# Altium PCB Membrane_Board.PcbDoc (part 4 of 5)
Units mm, origin at the board's own origin, x right, y up, seen from the top; angles counter-clockwise.
Board outline 303 x 126.06 mm, 2 copper layers (Top Layer, Bottom Layer), stack 1.499 mm thick; 248 components, 169 nets, 1258 pads, 728 vias.
Unrouted connection lines stored in the file: 317.
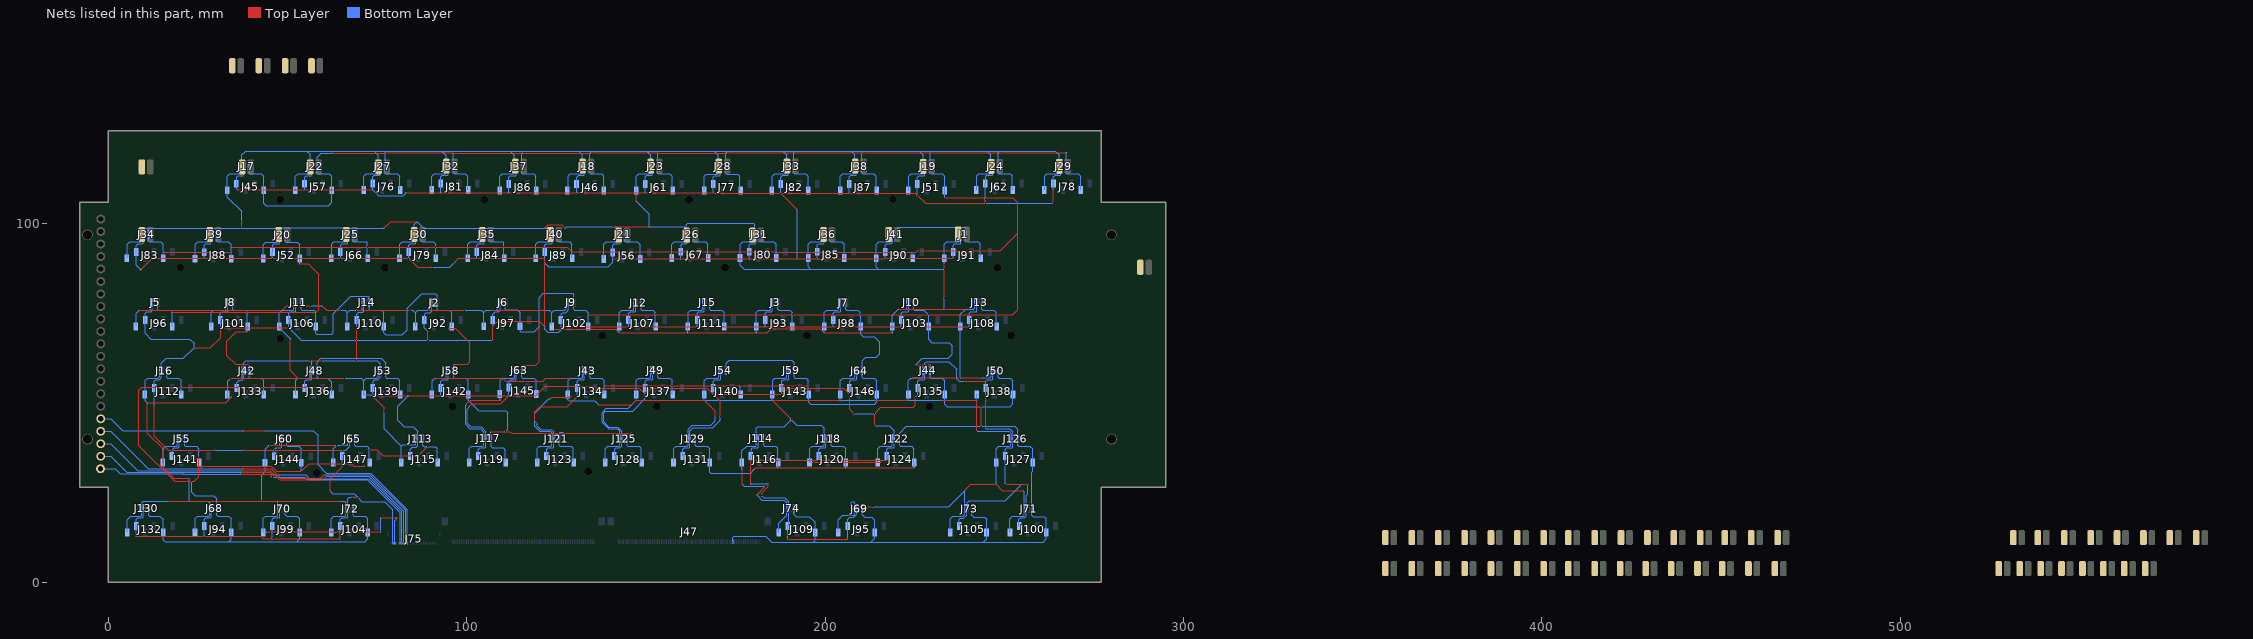
[diagram p4: the nets of this part, all layers, seen from the top]

## Via types
v1: diameter 0.4, hole 0.2, Top Layer to Bottom Layer, tented both sides, 724 vias
v2: diameter 0.4, hole 0.2, Top Layer to Bottom Layer, 3 vias
v3: diameter 0.6, hole 0.3, Top Layer to Bottom Layer, 1 vias

## Nets (pads, with @x,y where several pads share a name; then routed paths per layer and width w, separated by ;. In a path a pad name is that pad's centre, name@x,y a point inside that pad or via, vN(x,y) a via of type N, cw(c..) or ccw(c..) an arc to the next point about the centre after c; other vN are vias at no path point) (continued)
OLED_RST#: J1.5 J2.5 J3.5 J5.5 J6.5 J7.5 J8.5 J9.5 J10.5 J11.5 J12.5 J13.5 J14.5 J15.5 J16.5 J17.5 J18.5 J19.5 J20.5 J21.5 J22.5 J23.5 J24.5 J25.5 J26.5 J27.5 J28.5 J29.5 J30.5 J31.5 J32.5 J33.5 J34.5 J35.5 J36.5 J37.5 J38.5 J39.5 J40.5 J41.5 J42.5 J43.5 J44.5 J45.5 J46.5 J47.65 J48.5 J49.5 J50.5 J51.5 J52.5 J53.5 J54.5 J55.5 J56.5 J57.5 J58.5 J59.5 J60.5 J61.5 J62.5 J63.5 J64.5 J65.5 J66.5 J67.5 J68.5 J69.5 J70.5 J71.5 J72.5 J73.5 J74.5 J76.5 J77.5 J78.5 J79.5 J80.5 J81.5 J82.5 J83.5 J84.5 J85.5 J86.5 J87.5 J88.5 J89.5 J90.5 J91.5 J92.5 J93.5 J94.5 J95.5 J96.5 J97.5 J98.5 J99.5 J100.5 J101.5 J102.5 J103.5 J104.5 J105.5 J106.5 J107.5 J108.5 J109.5 J110.5 J111.5 J112.5 J113.5 J114.5 J115.5 J116.5 J117.5 J118.5 J119.5 J120.5 J121.5 J122.5 J123.5 J124.5 J125.5 J126.5 J127.5 J128.5 J129.5 J130.5 J131.5 J132.5 J133.5 J134.5 J135.5 J136.5 J137.5 J138.5 J139.5 J140.5 J141.5 J142.5 J143.5 J144.5 J145.5 J146.5 J147.5 | length 2367.4
  Top Layer w0.203: v1(15.252,92.087) v1(34.234,92.087) ; v1(17.825,75.364) v1(38.73,75.364) v1(57.846,75.364) 57.9,75.364 58.618,76.082 58.618,86.016 55.773,88.861 v1(53.411,88.861) ; v1(34.234,93.534) v1(53.411,93.534) 72.131,93.534 72.179,93.487 v1(72.232,93.487) ; v1(38.78,69.887) 35.631,69.887 33.04,67.296 33.04,63.207 35.453,60.794 v1(39.288,60.794) ; v1(62.44,119.783) 62.476,119.747 v1@77.273,119.747 ; v1@72.28,93.487 v1(91.308,93.487) ; v1(77.284,119.783) 77.337,119.783 77.435,119.882 95.926,119.882 96.012,119.795 96.203,119.795 v1@96.24,119.757 ; v1@91.308,93.534 v1(110.307,93.534) 127.96,93.534 v1(129.331,92.163) v1(148.381,92.163) v1(167.279,92.163) v1(186.304,92.163) ; v1(94.787,70.878) 96.769,70.878 100.858,66.788 100.858,61.556 100.172,60.87 v1(96.311,60.87) ; v1@96.261,119.783 v1(115.26,119.783) v1(134.266,119.783) 134.269,119.786 153.271,119.786 v1(153.274,119.79) ; v1(110.764,42.049) 111.977,42.049 112.46,41.566 v1(126.944,41.566) v1(145.994,41.566) ; v1(115.311,60.591) 119.222,60.591 120.137,61.505 v1(120.137,71.284) ; v1(138.323,54.876) v1(157.322,54.876) v1(176.321,54.876) v1(195.346,54.876) ; v1@153.274,119.783 172.181,119.783 v1(172.188,119.79) ; v1@172.191,119.786 191.253,119.786 v1(191.257,119.79) ; v1@186.351,92.141 v1(205.295,92.141) v1(224.31,92.141) 225.321,92.141 225.73,92.549 248.785,92.549 253.69,97.454 ; v1@191.26,119.786 191.263,119.79 v1(210.196,119.79) ; v1@210.199,119.786 210.202,119.79 v1(229.306,119.79) ; v1(225.267,60.667) v1@229.28,60.667 ; v1@229.309,119.786 229.313,119.79 v1(248.229,119.79) ; v1(233.344,107.276) 252.307,107.276 253.69,105.893 253.69,97.454 ; v1(247.772,74.688) 252.369,74.688 253.69,76.008 253.69,97.454 ; v1@248.229,119.783 248.245,119.799 267.219,119.799 v1(267.228,119.809)
  Top Layer w0.254: v1(25.242,35.038) 25.242,31.33 ; v1(62.275,54.391) v1(43.294,54.391) v1(20.264,54.391) 9.289,54.391 8.453,53.555 8.453,38.156 18.48,28.129 v1(23.21,28.129) 23.964,28.129 25.242,29.408 25.242,31.33 ; v1(71.546,32.346) 68.479,32.346 67.692,33.133 56.002,33.133 v1(53.817,30.949) 46.756,30.949 45.359,32.346 26.258,32.346 25.242,31.33 ; v1(72.799,36.994) 75.001,36.994 76.626,35.368 86.482,35.368 v1(88.996,37.883) ; v1(106.725,42.049) v1(110.764,42.049) ; v1(133.827,74.688) v1(152.623,74.688) v1(171.775,74.688) v1(190.825,74.688) v1(209.824,74.688) v1(228.823,74.688) v1(247.772,74.688) ; v1(180.081,31.381) 180.639,31.939 v1(186.812,31.939) v1@205.735,31.939 ; v1@205.773,31.939 v1@224.772,31.939 ; v1(243.53,43.496) v1(243.53,49.059)
  Bottom Layer w0.203: v1(23.21,28.129) 23.21,25.183 24.26,24.134 29.444,24.134 30.229,23.349 J68.5@30.229,20.593 ; v1(38.78,69.887) 38.78,71.384 J101.5@38.806,71.409 ; J17.5@39.256,115.886 J17.5@39.26,115.89 ; J42.5@39.28,59.074 39.28,60.786 v1(39.288,60.794) ; J45.5@43.336,109.407 43.336,105.768 43.987,105.117 61.412,105.117 62.325,106.03 J57.5@62.325,109.407 ; J106.5@57.846,71.409 57.846,69.515 58.161,69.201 62.275,69.201 62.733,69.658 62.733,74.916 67.584,79.768 72.588,79.768 72.758,79.598 J14.5@72.758,78.073 ; J22.5@58.248,116.072 58.248,118.624 59.382,119.757 62.414,119.757 v1(62.44,119.783) ; J27.5@77.282,116.099 77.282,119.782 v1(77.284,119.783) ; J32.5@96.257,116.126 v1@96.257,119.757 ; v1(96.311,60.87) 96.321,60.861 J58.5@96.321,59.074 ; v1@106.734,42.049 106.734,40.134 J117.5@106.743,40.126 ; J37.5@115.257,116.05 v1@115.257,119.783 ; J63.5@115.303,59.099 115.303,60.583 v1(115.311,60.591) ; J121.5@125.725,40.1 125.737,40.113 125.737,41.536 126.021,41.82 126.69,41.82 v1(126.944,41.566) ; J18.5@134.262,115.915 v1@134.262,119.783 ; J125.5@144.716,40.1 144.724,40.108 144.724,41.447 144.843,41.566 v1(145.994,41.566) ; J23.5@153.271,116.1 153.271,119.786 v1(153.274,119.79) ; J131.5@167.828,33.436 167.828,30.73 168.078,30.48 179.18,30.48 v1(180.081,31.381) ; J28.5@172.185,116.253 172.185,119.786 v1(172.188,119.79) ; J33.5@191.25,116.122 191.253,116.126 191.253,119.786 v1(191.257,119.79) ; J98.5@209.859,71.384 209.859,69.217 210.561,68.515 213.685,68.515 215.234,66.966 215.234,63.791 214.218,62.775 211.297,62.775 210.307,61.784 J64.5@210.307,59.074 ; J38.5@210.196,116.056 v1(210.196,119.79) ; J41.5@220.306,97.072 220.306,98.911 220.517,99.122 239.009,99.122 239.28,98.851 J1.5@239.28,97.072 ; v1(225.267,60.667) 227.121,62.521 234.386,62.521 235.453,63.588 235.453,66.001 234.614,66.839 229.788,66.839 228.841,67.787 J103.5@228.841,71.409 ; v1@229.297,60.65 229.297,59.116 J44.5@229.314,59.099 ; J19.5@229.306,116.056 v1(229.306,119.79) ; v1(248.229,119.79) 248.23,119.788 J24.5@248.23,116.148 ; v1(267.228,119.809) 267.237,119.799 J29.5@267.237,116.122
  Bottom Layer w0.254: J34.5@11.239,97.072 11.239,95.167 11.442,94.964 14.592,94.964 15.252,94.304 v1(15.252,92.087) J83.5@15.252,90.475 ; J130.5@11.256,20.593 11.256,18.688 11.459,18.485 14.338,18.485 15.269,17.554 J132.5@15.269,13.996 ; J5.5@13.744,78.073 13.744,76.168 13.947,75.965 17.677,75.965 17.825,75.816 v1(17.825,75.364) ; J132.5@15.336,13.929 15.336,11.924 15.895,11.365 71.597,11.365 72.35,12.118 J104.5@72.35,13.903 72.35,17.732 71.623,18.459 68.473,18.459 68.27,18.663 J72.5@68.27,20.568 ; J16.5@16.251,59.074 16.251,57.169 16.454,56.966 19.603,56.966 20.264,56.305 v1(20.264,54.391) J112.5@20.264,52.477 ; J96.5@17.824,71.409 v1@17.824,75.37 ; J55.5@21.246,40.049 21.246,38.144 21.45,37.941 24.599,37.941 25.26,37.281 J141.5@25.26,33.452 ; J68.5@30.229,20.593 30.229,18.688 30.432,18.485 33.581,18.485 34.242,17.824 J94.5@34.242,13.996 ; J39.5@30.229,97.098 30.229,95.193 30.432,94.99 33.49,94.99 34.234,94.246 ; 33.764,11.404 34.309,11.948 J94.5@34.309,13.929 ; J88.5@34.242,90.5 34.242,94.329 ; J8.5@34.726,78.073 34.726,76.168 34.929,75.965 38.57,75.965 38.73,75.805 v1(38.73,75.364) 38.73,71.485 J101.5@38.806,71.409 ; J17.5@39.256,115.886 39.256,114.167 39.46,113.963 42.609,113.963 43.27,113.303 J45.5@43.27,109.474 ; J42.5@39.28,59.074 39.28,57.169 39.484,56.966 42.633,56.966 43.294,56.305 v1(43.294,54.391) J133.5@43.294,52.477 ; J70.5@49.255,20.568 49.255,19.001 49.797,18.459 52.607,18.459 53.335,17.732 J99.5@53.335,13.903 53.335,12.102 52.623,11.391 ; J20.5@49.271,97.022 49.271,95.117 49.474,94.913 52.743,94.913 53.411,94.246 v1(53.411,88.861) ; J60.5@49.788,40.049 49.788,38.144 49.991,37.941 53.141,37.941 53.801,37.281 53.801,33.369 53.817,33.353 v1(53.817,30.949) ; J11.5@53.766,78.073 53.766,76.168 53.97,75.965 57.395,75.965 v1@57.819,75.542 ; J106.5@57.846,71.409 v1@57.846,75.191 ; J22.5@58.245,116.072 58.245,114.167 58.448,113.963 61.598,113.963 62.258,113.303 J57.5@62.258,109.474 ; J136.5@62.275,52.477 v1(62.275,54.391) 62.275,55.815 61.158,56.933 58.498,56.933 58.262,57.169 J48.5@58.262,59.074 58.262,61.48 59.227,62.445 76.169,62.445 77.322,61.292 J53.5@77.322,59.049 77.322,57.144 77.525,56.94 80.674,56.94 81.335,56.28 J139.5@81.335,52.451 ; J25.5@68.27,97.072 68.27,95.167 68.473,94.964 72.072,94.964 72.232,94.804 72.232,90.526 J66.5@72.35,90.408 ; J65.5@68.786,40.075 68.786,38.17 68.989,37.967 72.139,37.967 72.799,37.306 v1(72.799,36.994) J147.5@72.799,33.477 ; J14.5@72.758,78.073 72.758,76.168 72.961,75.965 76.11,75.965 76.771,75.305 J110.5@76.771,71.476 ; J110.5@76.838,71.409 76.838,69.574 77.312,69.1 82.011,69.1 83.383,70.471 83.383,76.491 87.421,80.53 91.206,80.53 91.706,80.03 J2.5@91.706,78.048 91.706,76.143 91.909,75.94 95.059,75.94 95.719,75.279 J92.5@95.719,71.45 ; J27.5@77.28,116.097 77.28,114.192 77.483,113.989 80.633,113.989 81.293,113.328 J76.5@81.293,109.5 ; J30.5@87.286,97.072 87.286,95.167 87.49,94.964 90.684,94.964 91.308,94.341 v1(91.308,93.487) ; J113.5@87.744,40.1 87.744,38.195 88.056,37.883 v1(88.996,37.883) 91.205,37.883 91.757,37.332 J115.5@91.757,33.503 ; J79.5@91.3,90.475 91.308,90.483 v1@91.308,93.479 ; J32.5@96.254,116.122 96.254,114.217 96.457,114.014 99.607,114.014 100.267,113.354 J81.5@100.267,109.525 ; J58.5@96.321,59.074 96.321,57.169 96.524,56.966 99.674,56.966 100.334,56.305 100.334,50.777 103.271,47.84 110.797,47.84 111.35,47.287 111.424,47.212 111.424,42.709 v1(110.764,42.049) ; J35.5@106.311,97.072 106.311,95.167 106.514,94.964 110.02,94.964 110.307,94.677 110.307,94.246 ; J117.5@106.743,40.126 106.743,37.789 107.03,37.502 110.104,37.502 110.756,36.85 J119.5@110.756,33.528 ; J84.5@110.324,90.475 110.324,94.304 ; J6.5@110.756,78.099 110.756,76.194 110.959,75.99 114.109,75.99 114.836,75.263 J97.5@114.836,71.434 114.836,70.069 114.985,69.92 118.772,69.92 v1(120.137,71.284) 120.137,79.437 121.33,80.631 129.509,80.631 129.773,80.368 J9.5@129.773,78.073 129.773,76.168 129.976,75.965 133.125,75.965 133.822,75.269 133.822,74.693 v1(133.827,74.688) J102.5@133.827,71.517 ; J37.5@115.253,116.046 115.253,114.141 115.456,113.938 118.606,113.938 119.266,113.278 J86.5@119.266,109.449 ; J63.5@115.303,59.099 115.303,57.194 115.506,56.991 118.655,56.991 119.316,56.331 J145.5@119.316,52.502 ; J40.5@125.294,97.072 125.294,95.167 125.497,94.964 128.647,94.964 129.331,94.28 v1(129.331,92.163) J89.5@129.331,90.499 ; J121.5@125.725,40.1 125.725,38.195 125.928,37.992 129.077,37.992 129.738,37.332 J123.5@129.738,33.503 ; J18.5@134.251,116.122 134.251,114.217 134.454,114.014 137.604,114.014 138.264,113.354 J46.5@138.264,109.525 ; J43.5@134.284,59.074 134.284,57.169 134.488,56.966 137.637,56.966 138.323,56.28 v1(138.323,54.876) J134.5@138.323,52.502 ; J21.5@144.241,97.072 144.241,95.167 144.444,94.964 147.594,94.964 148.381,94.177 v1(148.381,92.163) J56.5@148.381,90.232 ; J125.5@144.716,40.1 144.716,38.195 144.919,37.992 148.069,37.992 148.729,37.332 J128.5@148.729,33.503 ; J12.5@148.619,77.997 148.619,76.092 148.823,75.889 151.972,75.889 152.633,75.228 J107.5@152.633,71.4 ; J23.5@153.268,116.097 153.268,114.192 153.471,113.989 156.62,113.989 157.281,113.328 J61.5@157.281,109.5 ; J49.5@153.318,59.099 153.318,57.194 153.522,56.991 156.671,56.991 157.332,56.331 J137.5@157.332,52.502 ; J26.5@163.258,97.098 163.258,95.193 163.461,94.99 166.611,94.99 167.271,94.329 J67.5@167.271,90.5 ; J129.5@163.748,40.1 163.748,38.195 163.952,37.992 167.101,37.992 167.828,37.265 J131.5@167.828,33.436 ; J15.5@167.779,78.073 167.779,76.168 167.982,75.965 171.132,75.965 171.792,75.305 J111.5@171.792,71.476 ; J28.5@172.2,116.021 172.2,114.116 172.403,113.913 175.553,113.913 176.213,113.252 J77.5@176.213,109.423 ; J54.5@172.316,59.099 172.316,61.081 173.172,61.937 190.698,61.937 191.315,61.319 J59.5@191.315,59.099 191.315,57.194 191.519,56.991 194.668,56.991 195.329,56.331 J143.5@195.329,52.502 ; J47.65@174.26,11.315 174.26,12.53 174.62,12.889 183.459,12.889 185.135,11.213 196.692,11.213 ; J140.5@176.329,52.502 v1@176.329,54.876 ; J31.5@182.3,97.098 182.3,95.193 182.503,94.99 185.653,94.99 186.313,94.329 J80.5@186.313,90.5 ; J114.5@182.79,40.126 182.79,38.221 182.994,38.017 186.143,38.017 186.812,37.349 186.812,33.52 J116.5@186.87,33.461 186.812,33.403 v1(186.812,31.939) ; J3.5@186.78,78.073 186.78,76.168 186.983,75.965 190.132,75.965 190.793,75.305 J93.5@190.793,71.476 ; J33.5@191.25,116.122 191.25,114.217 191.453,114.014 194.603,114.014 195.263,113.354 J82.5@195.263,109.525 ; J74.5@191.258,20.593 191.258,18.959 191.892,18.325 195.575,18.325 197.218,16.682 J109.5@197.218,13.929 197.218,11.738 196.692,11.213 ; J143.5@195.395,52.435 195.395,50.254 195.956,49.694 213.761,49.694 214.387,50.32 J146.5@214.387,52.41 214.387,56.239 213.659,56.966 210.51,56.966 210.307,57.169 J64.5@210.307,59.074 ; J36.5@201.282,97.098 201.282,95.193 201.485,94.99 204.634,94.99 205.295,94.329 v1(205.295,92.141) J85.5@205.295,90.5 ; J118.5@201.697,40.1 201.697,38.195 201.901,37.992 205.05,37.992 205.711,37.332 J120.5@205.711,33.503 ; v1(205.76,31.939) J120.5@205.76,33.419 ; J7.5@205.779,78.048 205.779,76.143 205.982,75.94 209.132,75.94 209.792,75.279 v1@209.792,74.688 ; v1(209.824,74.688) 209.824,74.648 209.859,74.613 J98.5@209.859,71.384 ; J38.5@210.205,116.122 210.205,114.217 210.408,114.014 213.558,114.014 214.218,113.354 J87.5@214.218,109.525 ; J69.5@210.307,20.568 210.307,18.884 211.018,18.173 212.974,18.173 213.853,17.293 J95.5@213.853,13.929 213.853,12.296 212.77,11.213 ; J90.5@224.319,90.475 v1@224.319,92.141 ; J124.5@224.743,33.477 224.743,37.306 224.083,37.967 220.933,37.967 220.73,38.17 J122.5@220.73,40.075 220.73,41.575 222.651,43.496 v1(243.53,43.496) 252.953,43.496 253.774,42.676 J126.5@253.774,40.075 253.774,38.17 253.977,37.967 257.127,37.967 257.854,37.239 J127.5@257.854,33.411 257.854,30.922 257.597,30.665 257.597,24.323 257.595,24.321 J71.5@257.595,20.568 ; J10.5@224.761,78.073 224.761,76.168 224.964,75.965 227.546,75.965 v1(228.823,74.688) ; v1(224.785,31.939) 224.785,33.385 J124.5@224.81,33.411 ; J103.5@228.837,71.413 v1@228.837,74.62 ; J44.5@229.314,59.099 229.314,57.194 229.517,56.991 232.667,56.991 233.394,56.264 J135.5@233.394,52.435 233.394,49.721 234.081,49.034 251.658,49.034 252.394,49.77 J138.5@252.394,52.41 252.394,56.239 251.667,56.966 248.518,56.966 248.314,57.169 J50.5@248.314,59.074 ; J19.5@229.315,116.046 229.315,114.141 229.518,113.938 232.668,113.938 233.328,113.278 J51.5@233.328,109.449 ; v1(233.344,107.276) J51.5@233.344,109.366 ; J1.5@239.28,97.072 239.28,95.167 239.483,94.964 242.633,94.964 243.293,94.304 J91.5@243.293,90.475 ; J73.5@240.923,20.568 240.923,18.663 241.413,18.173 244.563,18.173 245.003,17.732 J105.5@245.003,13.929 245.003,12.153 244.063,11.213 ; J13.5@243.742,78.073 243.742,76.168 243.946,75.965 247.095,75.965 247.756,75.305 J108.5@247.756,71.476 ; J24.5@248.23,116.122 248.23,114.243 248.433,114.04 251.583,114.04 252.243,113.379 J62.5@252.243,109.55 ; J71.5@257.585,20.577 257.585,18.672 257.983,18.274 261.133,18.274 261.665,17.742 J100.5@261.665,13.991 ; J100.5@261.716,13.929 261.716,12.102 260.827,11.213 244.063,11.213 ; J29.5@267.237,116.122 267.237,114.217 267.441,114.014 270.59,114.014 271.251,113.354 J78.5@271.251,109.525 ; 196.692,11.213 212.77,11.213 ; 212.77,11.213 244.063,11.213
  other v1: 229.306,60.667 243.276,92.549 96.261,119.757
Row.ROW_1: J75.17 P17.1 SW1.1 SW2.1 SW3.1 SW4.1 SW5.1 SW6.1 SW7.1 SW8.1 SW41.1 SW42.1 SW43.1 SW44.1 SW45.1 SW46.1 SW47.1 SW48.1 | length 110.2
  Top Layer w0.203: v1(37.536,42.252) v1(43.327,42.252)
  Bottom Layer w0.203: P17.1@-2.153,45.62 0.641,45.62 4.009,42.252 v1(37.536,42.252) ; v1(43.327,42.252) 57.189,42.252 58.465,40.976 58.465,32.828 60.802,30.492 73.156,30.492 83.389,20.258 J75.17@83.389,10.908
Row.ROW_2: J75.18 P18.1 SW9.1 SW10.1 SW11.1 SW12.1 SW13.1 SW14.1 SW15.1 SW16.1 SW49.1 SW50.1 SW51.1 SW52.1 SW53.1 SW54.1 SW55.1 SW56.1 | length 104.2
  Top Layer w0.203: v1(37.434,31.66) 45.353,31.66 48.031,28.981 59.106,28.981 v1(60.141,30.016)
  Bottom Layer w0.203: P18.1@-2.153,42.136 0.641,42.136 11.117,31.66 v1(37.434,31.66) v1@37.442,31.66 ; v1(60.141,30.016) 72.924,30.016 82.889,20.051 J75.18@82.889,10.908
Row.ROW_3: J75.19 P19.1 SW17.1 SW18.1 SW19.1 SW20.1 SW21.1 SW22.1 SW23.1 SW24.1 SW57.1 SW58.1 SW59.1 SW60.1 SW61.1 SW62.1 SW63.1 SW64.1 | length 102
  Top Layer w0.203: v1(37.002,31.177) 45.21,31.177 47.787,28.6 59.789,28.6 v1(60.726,29.537)
  Bottom Layer w0.203: P19.1@-2.153,38.653 0.641,38.653 8.116,31.177 v1(37.002,31.177) ; v1(60.726,29.537) 72.696,29.537 82.389,19.844 J75.19@82.389,10.908
Row.ROW_4: J75.20 P20.1 SW25.1 SW26.1 SW27.1 SW28.1 SW29.1 SW30.1 SW31.1 SW32.1 SW65.1 SW66.1 SW67.1 SW68.1 SW69.1 SW70.1 SW71.1 SW72.1 | length 99.2
  Top Layer w0.203: v1(37.587,30.695) 45.015,30.695 v1(45.741,29.968)
  Bottom Layer w0.203: P20.1@-2.153,35.169 0.641,35.169 5.115,30.695 v1(37.587,30.695) ; v1(45.741,29.968) 45.763,29.947 55.042,29.947 56.032,28.956 72.57,28.956 81.889,19.637 J75.20@81.889,10.908
Row.ROW_5: J75.21 P21.1 SW33.1 SW34.1 SW35.1 SW36.1 SW37.1 SW38.1 SW39.1 SW40.1 SW73.1 SW74.1 SW75.1 SW76.1 SW77.1 SW78.1 SW79.1 SW80.1 | length 97.2
  Top Layer w0.203: v1(37.079,30.212) 44.819,30.212 v1(45.72,29.312)
  Bottom Layer w0.203: P21.1@-2.217,31.685 1.868,31.685 3.334,30.22 20.859,30.22 20.866,30.212 v1(37.079,30.212) ; v1(45.72,29.312) 54.712,29.312 55.474,28.55 72.233,28.55 81.389,19.393 J75.21@81.389,10.908
VCC_3V3: J1.2 J2.2 J3.2 J5.2 J6.2 J7.2 J8.2 J9.2 J10.2 J11.2 J12.2 J13.2 J14.2 J15.2 J16.2 J17.2 J18.2 J19.2 J20.2 J21.2 J22.2 J23.2 J24.2 J25.2 J26.2 J27.2 J28.2 J29.2 J30.2 J31.2 J32.2 J33.2 J34.2 J35.2 J36.2 J37.2 J38.2 J39.2 J40.2 J41.2 J42.2 J43.2 J44.2 J45.2 J46.2 J48.2 J49.2 J50.2 J51.2 J52.2 J53.2 J54.2 J55.2 J56.2 J57.2 J58.2 J59.2 J60.2 J61.2 J62.2 J63.2 J64.2 J65.2 J66.2 J67.2 J68.2 J69.2 J70.2 J71.2 J72.2 J73.2 J74.2 J75.25 J76.2 J77.2 J78.2 J79.2 J80.2 J81.2 J82.2 J83.2 J84.2 J85.2 J86.2 J87.2 J88.2 J89.2 J90.2 J91.2 J92.2 J93.2 J94.2 J95.2 J96.2 J97.2 J98.2 J99.2 J100.2 J101.2 J102.2 J103.2 J104.2 J105.2 J106.2 J107.2 J108.2 J109.2 J110.2 J111.2 J112.2 J113.2 J114.2 J115.2 J116.2 J117.2 J118.2 J119.2 J120.2 J121.2 J122.2 J123.2 J124.2 J125.2 J126.2 J127.2 J128.2 J129.2 J130.2 J131.2 J132.2 J133.2 J134.2 J135.2 J136.2 J137.2 J138.2 J139.2 J140.2 J141.2 J142.2 J143.2 J144.2 J145.2 J146.2 J147.2 | length 2042.9
  Top Layer w0.254: v1(7.716,12.864) 7.739,12.841 26.666,12.841 v1(26.689,12.818) ; v1(9.037,87.159) 12.247,90.369 v1(26.691,90.369) v1(45.767,90.369) v1(64.773,90.369) v1(83.772,90.369) 86.27,87.87 v1(90.266,87.87) ; v1(12.711,49.5) 12.711,40.782 16.651,36.842 v1(17.775,36.842) v1(29.721,36.842) ; v1(23.896,65.445) 28.446,65.445 31.287,68.287 v1(31.287,71.03) v1(50.296,71.03) ; v1@26.689,12.864 42.565,12.864 43.251,12.178 v1(45.715,12.178) v1(64.73,12.178) ; v1(35.758,109.486) v1(54.706,109.486) v1(73.782,109.486) ; v1(37.815,36.842) v1(65.271,36.842) ; v1(56.383,61.835) v1(59.914,61.835) ; v1(61.869,25.386) 61.869,28.869 v1(65.222,32.222) ; v1@68.321,23.684 v1(69.565,23.684) ; v1(69.218,61.835) v1(69.218,67.499) v1(69.218,71.259) ; v1(75.052,52.033) v1(83.586,52.033) v1(92.781,52.033) v1(111.755,52.033) ; v1@83.14,108.661 v1(92.773,108.661) v1(111.752,108.661) v1(130.616,108.661) ; v1(89.098,67.499) v1(89.098,70.065) ; v1(96.565,89.267) 97.667,90.369 v1(102.814,90.369) v1(121.788,90.369) v1(121.788,71.284) 120.213,72.859 108.564,72.859 v1(107.217,71.513) v1@107.217,67.498 ; v1(100.858,49.059) 101.569,49.77 109.492,49.77 v1(111.755,52.033) ; v1(119.583,44.272) 118.897,44.958 118.897,47.549 120.306,48.957 127.96,48.957 v1(130.744,51.742) ; v1(126.283,71.284) v1(145.114,71.284) v1(164.291,71.284) v1(183.29,71.284) v1(202.229,71.284) v1(221.263,71.284) v1(240.202,71.284) ; 130.819,108.661 v1(149.785,108.661) v1(168.751,108.661) ; v1(140.763,90.315) v1(159.719,90.315) v1@178.75,90.315 ; v1@168.751,108.534 v1@187.59,108.534 ; v1(170.733,46.316) 170.733,50.481 v1(168.803,52.412) ; v1(178.761,90.315) v1(192.222,90.315) v1(197.743,90.315) v1@216.742,90.315 ; v1(179.242,27.418) 179.25,27.426 v1(179.25,33.99) ; v1@179.258,33.998 v1@198.191,33.998 ; v1(182.29,24.192) 182.29,24.908 184.125,26.742 v1(184.125,27.457) ; v1(189.598,12.004) v1(206.309,12.004) ; v1@192.222,103.902 v1(187.59,108.534) ; v1@198.208,34.006 v1(217.231,34.006) ; v1(207.97,47.052) 206.808,48.214 v1(206.808,52.455) 205.106,54.156 189.517,54.156 v1(187.825,52.464) 187.799,52.438 168.829,52.438 v1(168.803,52.412) ; v1@213.786,46.9 213.786,43.7 v1@213.812,43.674 ; v1(213.786,47.052) 215.514,48.78 224.505,48.78 225.191,49.465 v1(225.191,51.574) ; v1(216.768,90.36) v1(235.707,90.359) ; v1(239.041,56.102) v1(244.816,56.102) ; v1(244.69,105.701) 227.999,105.701 v1(225.724,107.976) 225.166,108.534 v1(206.759,108.534) v1(187.59,108.534) ; v1@244.69,105.768 v1(244.69,106.796) ; v1(244.774,42.785) v1(244.774,50.812) ; v1(250.235,27.329) v1(256.458,27.329) ; v1(263.697,105.701) v1(263.697,109.689) ; v1(111.755,52.033) 119.199,52.033 121.915,54.749 v1(129.535,54.749) 135.605,54.749 136.24,54.114 148.127,54.114 v1(149.82,52.421) 151.512,54.114 167.101,54.114 v1(168.803,52.412)
  Bottom Layer w0.203: J125.2@143.216,40.1 143.216,42.185 142.108,43.293 139.644,43.293 138.151,44.787 138.151,47.213 138.65,47.713 146.248,47.713 149.82,51.285 v1(149.82,52.421)
  Bottom Layer w0.254: v1(7.716,12.864) J132.2@7.716,15.729 ; J132.2@7.758,15.77 7.758,17.621 8.164,18.028 9.607,18.028 9.756,18.176 J130.2@9.756,20.593 ; v1(9.037,87.159) 7.699,88.497 J83.2@7.699,92.208 7.699,93.949 8.257,94.507 9.59,94.507 9.739,94.656 J34.2@9.739,97.072 ; J96.2@10.204,73.209 10.204,69.482 11.831,67.855 22.728,67.855 23.9,66.683 v1@23.9,65.441 ; J96.2@10.245,73.25 10.245,75.101 10.652,75.508 11.889,75.508 12.244,75.863 J5.2@12.244,78.073 ; v1(12.711,49.5) J112.2@12.711,54.21 ; J112.2@12.752,54.251 12.752,56.102 13.158,56.509 14.175,56.509 14.751,57.084 J16.2@14.751,59.074 14.751,61.072 16.149,62.47 20.921,62.47 v1(23.896,65.445) ; J141.2@17.748,35.227 17.748,36.842 18.39,37.484 19.408,37.484 19.746,37.823 J55.2@19.746,40.049 ; v1(26.689,12.818) J94.2@26.689,15.729 ; v1@26.69,90.37 J88.2@26.69,92.091 26.69,94.086 27.136,94.532 28.58,94.532 28.729,94.681 J39.2@28.729,97.098 ; J94.2@26.73,15.77 26.73,17.621 27.136,18.028 28.58,18.028 28.729,18.176 J68.2@28.729,20.593 ; v1(29.721,36.842) v1(37.815,36.842) ; J101.2@31.211,73.087 31.287,73.011 v1(31.287,71.03) ; J101.2@31.227,73.25 31.227,75.101 31.634,75.508 33.077,75.508 33.226,75.657 J8.2@33.226,78.073 ; v1(35.758,109.486) 35.758,113.1 36.164,113.506 37.608,113.506 37.756,113.655 J17.2@37.756,116.072 ; J133.2@35.782,54.251 35.782,55.738 36.469,56.425 37.307,56.425 37.78,56.898 J42.2@37.78,59.074 37.78,61.267 38.349,61.835 v1(56.383,61.835) 56.762,61.456 J48.2@56.762,59.074 56.762,56.657 56.606,56.501 55.163,56.501 54.764,56.102 J136.2@54.764,54.251 ; v1(45.715,12.178) J99.2@45.715,15.703 ; J99.2@45.756,15.745 45.756,17.596 46.162,18.002 47.606,18.002 47.755,18.151 J70.2@47.755,20.568 ; v1(45.767,90.369) J52.2@45.767,92.165 ; J52.2@45.772,92.199 45.772,94.05 46.178,94.456 47.622,94.456 47.771,94.605 J20.2@47.771,97.022 ; J144.2@46.289,35.227 46.289,36.918 46.856,37.484 48.139,37.484 48.288,37.633 J60.2@48.288,40.049 ; J106.2@50.268,73.25 50.268,75.101 50.674,75.508 52.118,75.508 52.266,75.657 J11.2@52.266,78.073 ; v1@50.295,71.03 J106.2@50.295,72.7 ; v1(50.296,71.03) 53.827,67.499 v1(69.218,67.499) v1(89.098,67.499) v1(107.208,67.499) ; v1(54.706,109.486) 54.705,109.487 J57.2@54.705,111.207 54.705,113.058 55.153,113.506 56.596,113.506 56.745,113.655 J22.2@56.745,116.072 ; v1(59.914,61.835) 75.001,61.835 75.822,61.014 J53.2@75.822,59.049 75.822,57.22 75.084,56.483 74.229,56.483 73.823,56.077 J139.2@73.823,54.226 ; v1(61.869,25.386) 62.529,24.726 68.524,24.726 v1(69.565,23.684) 70.734,22.516 77.108,22.516 79.389,20.235 J75.25@79.389,10.908 ; v1(64.73,12.178) J104.2@64.73,15.703 64.73,17.554 65.178,18.002 66.621,18.002 66.77,18.151 J72.2@66.77,20.568 66.77,23.327 67.127,23.684 v1(68.27,23.684) ; v1(64.773,90.369) 64.771,94.101 65.178,94.507 66.621,94.507 66.77,94.656 J25.2@66.77,97.072 ; v1(65.222,32.222) 65.246,32.246 J147.2@65.246,35.211 65.271,35.236 v1(65.271,36.842) 66.212,36.842 67.286,37.915 J65.2@67.286,40.075 ; v1(69.218,71.259) J110.2@69.218,73.209 69.218,74.772 69.845,75.399 71,75.399 71.258,75.657 J14.2@71.258,78.073 ; v1@73.74,109.527 75.453,107.814 82.261,107.814 v1(83.108,108.661) ; J76.2@73.74,111.311 73.782,111.27 v1(73.782,109.486) ; J139.2@73.773,54.176 J139.2@73.782,54.184 73.782,52.793 74.542,52.033 v1(75.052,52.033) ; J76.2@73.782,111.274 73.782,113.125 74.188,113.532 75.631,113.532 75.78,113.68 J27.2@75.78,116.097 ; v1(83.586,52.033) 80.716,49.163 80.716,45.224 82.57,43.369 85.008,43.369 86.244,42.134 J113.2@86.244,40.1 86.244,38.128 85.821,37.705 84.78,37.705 84.245,37.17 J115.2@84.245,35.277 ; v1(83.772,90.369) J79.2@83.772,92.312 ; J79.2@83.788,92.25 83.788,94.101 84.194,94.507 85.638,94.507 85.786,94.656 J30.2@85.786,97.072 ; J92.2@88.166,73.184 88.166,70.997 v1(89.098,70.065) ; J92.2@88.207,73.225 88.207,74.839 88.615,75.246 89.809,75.246 90.206,75.643 J2.2@90.206,78.048 ; v1(90.266,87.87) 95.168,87.87 v1(96.565,89.267) ; J81.2@92.729,111.311 92.773,111.267 v1(92.773,108.661) ; J81.2@92.755,111.3 92.755,113.151 93.162,113.557 94.605,113.557 94.754,113.706 J32.2@94.754,116.122 ; v1(92.781,52.033) J142.2@92.781,54.21 92.781,56.061 93.229,56.509 94.672,56.509 94.821,56.657 J58.2@94.821,59.074 ; v1(100.858,49.059) 100.101,48.302 100.101,44.329 101.087,43.344 103.957,43.344 105.243,42.058 J117.2@105.243,40.126 105.243,37.709 105.094,37.56 103.651,37.56 103.244,37.154 J119.2@103.244,35.303 ; v1@102.812,90.369 102.812,94.101 103.219,94.507 104.662,94.507 104.811,94.656 J35.2@104.811,97.072 ; v1@107.216,71.462 J97.2@107.216,73.182 ; J97.2@107.257,73.276 107.257,74.762 107.945,75.45 108.808,75.45 109.256,75.897 J6.2@109.256,78.099 ; J86.2@111.729,111.166 111.729,113.049 112.161,113.481 113.604,113.481 113.753,113.63 J37.2@113.753,116.046 ; v1(111.752,108.661) J86.2@111.752,111.166 ; v1(111.755,52.033) J145.2@111.755,54.364 111.755,56.078 112.21,56.534 113.654,56.534 113.803,56.683 J63.2@113.803,59.099 ; v1(119.583,44.272) 119.583,43.593 120.594,42.582 123.616,42.582 124.225,41.974 J121.2@124.225,40.1 124.225,37.684 124.076,37.535 122.632,37.535 122.226,37.128 J123.2@122.226,35.277 ; v1(121.788,71.284) 121.788,70.649 122.6,69.836 125.623,69.836 126.283,70.497 v1(126.283,71.284) ; J89.2@121.788,92.312 v1(121.788,90.369) 121.788,89.089 122.88,87.997 139.466,87.997 140.763,89.294 v1(140.763,90.315) ; J89.2@121.796,92.25 121.796,94.101 122.202,94.507 123.645,94.507 123.794,94.656 J40.2@123.794,97.072 ; v1@126.274,71.275 126.274,74.78 126.741,75.246 127.63,75.246 128.273,75.889 J9.2@128.273,78.073 ; v1(129.535,54.749) 130.76,54.749 130.786,54.774 130.786,56.102 131.192,56.509 132.636,56.509 132.784,56.657 J43.2@132.784,59.074 ; J46.2@130.601,111.166 130.601,113 131.159,113.557 132.602,113.557 132.751,113.706 J18.2@132.751,116.122 ; v1(130.616,108.661) J46.2@130.616,111.151 ; v1(130.744,51.742) J134.2@130.744,54.21 ; J56.2@140.743,92.25 140.743,94.101 141.149,94.507 142.592,94.507 142.741,94.656 J21.2@142.741,97.072 ; v1@140.761,90.316 J56.2@140.761,92.032 ; J128.2@141.217,35.277 141.217,37.128 141.624,37.535 142.725,37.535 143.216,38.026 J125.2@143.216,40.1 ; J107.2@145.079,73.133 145.114,73.098 v1(145.114,71.284) ; J107.2@145.121,73.174 145.121,75.025 145.527,75.432 146.971,75.432 147.119,75.58 J12.2@147.119,77.997 ; J61.2@149.769,111.274 149.769,113.125 150.175,113.532 151.619,113.532 151.768,113.68 J23.2@151.768,116.097 ; v1(149.785,108.661) J61.2@149.785,111.166 ; v1(149.82,52.421) 149.82,56.128 150.226,56.534 151.67,56.534 151.818,56.683 J49.2@151.818,59.099 ; v1@159.718,90.315 J67.2@159.718,92.238 ; J67.2@159.759,92.275 159.759,94.126 160.166,94.532 161.258,94.532 161.758,95.032 J26.2@161.758,97.098 ; J131.2@160.25,35.277 160.25,37.128 160.656,37.535 162.1,37.535 162.248,37.684 J129.2@162.248,40.1 162.248,42.225 163.139,43.115 168.574,43.115 170.733,45.274 v1(170.733,46.316) ; J111.2@164.239,73.209 164.291,73.157 v1(164.291,71.284) ; J111.2@164.28,73.25 164.28,75.101 164.687,75.508 166.13,75.508 166.279,75.657 J15.2@166.279,78.073 ; v1(168.751,108.661) J77.2@168.751,111.166 ; J77.2@168.752,111.166 168.752,113.1 169.108,113.455 170.551,113.455 170.7,113.604 J28.2@170.7,116.021 ; J140.2@168.776,54.235 168.803,54.208 v1(168.803,52.412) ; J140.2@168.818,54.277 168.818,56.128 169.224,56.534 170.667,56.534 170.816,56.683 J54.2@170.816,59.099 ; v1@178.76,90.315 J80.2@178.76,92.238 ; J80.2@178.801,92.275 178.801,94.126 179.208,94.532 180.651,94.532 180.8,94.681 J31.2@180.8,97.098 ; v1(179.242,27.418) 179.262,27.438 184.105,27.438 v1(184.125,27.457) ; v1(179.25,33.99) J116.2@179.25,35.179 ; J116.2@179.292,35.303 179.292,37.154 179.698,37.56 181.142,37.56 181.29,37.709 J114.2@181.29,40.126 ; v1(182.29,24.192) 182.925,23.557 188.691,23.557 189.758,22.491 J74.2@189.758,20.593 189.758,15.889 J109.2@189.598,15.729 v1(189.598,12.004) ; J93.2@183.281,73.25 183.281,75.101 183.687,75.508 185.131,75.508 185.28,75.657 J3.2@185.28,78.073 ; v1@183.289,71.233 J93.2@183.289,72.954 ; v1(187.59,108.534) J82.2@187.59,111.166 ; J82.2@187.599,111.166 187.599,112.998 188.158,113.557 189.601,113.557 189.75,113.706 J33.2@189.75,116.122 ; 187.817,56.128 188.223,56.534 189.667,56.534 189.815,56.683 J59.2@189.815,59.099 ; v1(187.825,52.464) 187.825,56.17 ; v1(192.222,90.315) v1(192.222,103.898) ; v1@197.742,90.315 J85.2@197.742,92.308 ; J85.2@197.783,92.275 197.783,94.126 198.189,94.532 199.633,94.532 199.782,94.681 J36.2@199.782,97.098 ; J120.2@198.157,35.236 198.199,35.195 v1(198.199,34.006) ; J120.2@198.199,35.277 198.199,37.128 198.605,37.535 200.049,37.535 200.197,37.684 J118.2@200.197,40.1 ; v1(202.229,71.284) J98.2@202.229,72.845 ; J98.2@202.28,73.225 202.28,75.076 202.687,75.482 204.13,75.482 204.279,75.631 J7.2@204.279,78.048 ; v1(206.309,12.004) 206.309,15.653 J95.2@206.233,15.729 206.233,17.604 206.801,18.173 207.995,18.173 208.807,18.984 J69.2@208.807,20.568 ; J87.2@206.706,111.3 206.706,113.151 207.113,113.557 208.556,113.557 208.705,113.706 J38.2@208.705,116.122 ; v1(206.759,108.534) J87.2@206.759,111.166 ; v1(206.808,52.455) 206.808,56.102 207.214,56.509 208.658,56.509 208.807,56.657 J64.2@208.807,59.074 ; v1(207.97,47.052) v1(213.786,47.052) ; v1@213.812,43.674 217.901,43.674 219.23,42.345 J122.2@219.23,40.075 219.23,37.658 219.081,37.509 217.638,37.509 217.231,37.103 v1(217.231,34.006) ; v1@216.766,90.36 J90.2@216.766,92.283 ; J90.2@216.808,92.25 216.808,94.101 217.214,94.507 218.434,94.507 218.806,94.88 J41.2@218.806,97.072 ; v1@221.262,71.285 J103.2@221.262,73.208 ; J103.2@221.262,73.25 221.262,75.101 221.668,75.508 223.112,75.508 223.261,75.657 J10.2@223.261,78.073 ; v1(225.191,51.574) 225.774,52.156 J135.2@225.774,54.235 225.826,54.287 225.826,56.138 226.222,56.534 227.665,56.534 227.814,56.683 J44.2@227.814,59.099 227.814,61.054 228.341,61.581 234.538,61.581 236.697,59.422 236.697,56.831 237.426,56.102 v1(239.041,56.102) ; v1(225.724,107.976) J51.2@225.724,111.166 225.724,112.982 226.223,113.481 227.666,113.481 227.815,113.63 J19.2@227.815,116.046 ; v1(235.707,90.359) 235.707,92.175 J91.2@235.74,92.208 235.74,94.059 236.188,94.507 237.631,94.507 237.78,94.656 J1.2@237.78,97.072 ; J105.2@237.383,15.782 237.383,17.554 237.671,17.842 238.526,17.842 239.423,18.739 J73.2@239.423,20.568 239.423,22.067 240.126,22.77 250.286,22.77 254.845,27.329 v1(256.458,27.329) 256.458,24.609 256.095,24.246 J71.2@256.095,20.568 ; v1(240.202,71.284) J108.2@240.202,73.099 ; J108.2@240.244,73.25 240.244,75.101 240.65,75.508 242.094,75.508 242.242,75.657 J13.2@242.242,78.073 ; v1(244.69,105.701) v1(263.697,105.701) ; v1(244.69,106.796) J62.2@244.69,111.284 ; J62.2@244.732,111.325 244.732,113.176 245.138,113.582 246.581,113.582 246.73,113.731 J24.2@246.73,116.148 ; v1(244.774,42.785) 251.556,42.785 252.274,42.067 J126.2@252.274,40.075 252.274,37.658 252.125,37.509 250.682,37.509 250.275,37.103 J127.2@250.275,35.252 ; v1(244.774,50.812) J138.2@244.774,54.21 ; J138.2@244.816,54.251 v1(244.816,56.102) 245.222,56.509 246.666,56.509 246.814,56.657 J50.2@246.814,59.074 ; v1@250.234,27.329 J127.2@250.234,35.211 ; J100.2@254.045,15.791 254.045,17.564 254.493,18.012 255.561,18.012 256.085,18.536 J71.2@256.085,20.568 ; v1(263.697,109.689) J78.2@263.697,111.258 263.697,113.109 264.145,113.557 265.589,113.557 265.737,113.706 J29.2@265.737,116.122
  other v1: 46.299,36.842 213.786,43.674
VDD: J1.1 J2.1 J3.1 J5.1 J6.1 J7.1 J8.1 J9.1 J10.1 J11.1 J12.1 J13.1 J14.1 J15.1 J16.1 J17.1 J18.1 J19.1 J20.1 J21.1 J22.1 J23.1 J24.1 J25.1 J26.1 J27.1 J28.1 J29.1 J30.1 J31.1 J32.1 J33.1 J34.1 J35.1 J36.1 J37.1 J38.1 J39.1 J40.1 J41.1 J42.1 J43.1 J44.1 J45.1 J46.1 J48.1 J49.1 J50.1 J51.1 J52.1 J53.1 J54.1 J55.1 J56.1 J57.1 J58.1 J59.1 J60.1 J61.1 J62.1 J63.1 J64.1 J65.1 J66.1 J67.1 J68.1 J69.1 J70.1 J71.1 J72.1 J73.1 J74.1 J75.24 J76.1 J77.1 J78.1 J79.1 J80.1 J81.1 J82.1 J83.1 J84.1 J85.1 J86.1 J87.1 J88.1 J89.1 J90.1 J91.1 J92.1 J93.1 J94.1 J95.1 J96.1 J97.1 J98.1 J99.1 J100.1 J101.1 J102.1 J103.1 J104.1 J105.1 J106.1 J107.1 J108.1 J109.1 J110.1 J111.1 J112.1 J113.1 J114.1 J115.1 J116.1 J117.1 J118.1 J119.1 J120.1 J121.1 J122.1 J123.1 J124.1 J125.1 J126.1 J127.1 J128.1 J129.1 J130.1 J131.1 J132.1 J133.1 J134.1 J135.1 J136.1 J137.1 J138.1 J139.1 J140.1 J141.1 J142.1 J143.1 J144.1 J145.1 J146.1 J147.1 | length 2288.7
  Top Layer w0.203: v1(76.879,98.843) 78.696,100.66 v1(86.106,100.66) ; v1(121.858,98.85) 122.78,99.771 126.524,99.771 v1(127.452,98.843) ; v1@140.877,99.275 v1(150.837,99.275)
  Top Layer w0.254: v1(8.638,75.965) v1(29.373,75.965) v1(48.45,75.965) 49.712,77.228 v1(56.433,77.228) ; v1(16.682,22.643) v1(47.255,22.643) v1(64.663,22.643) ; v1(22.524,28.968) 18.276,28.968 15.235,32.009 v1(15.235,37.197) 10.786,41.645 v1(10.786,50.15) 32.681,50.15 v1(34.231,51.7) ; v1(34.056,56.933) v1(52.877,56.933) ; v1(37.155,98.818) v1(37.155,100.621) ; v1(44.337,14.15) v1(63.286,14.15) 76.001,14.15 v1(76.017,14.134) ; v1(44.884,38.17) v1(63.636,38.17) ; v1(50.693,67.914) 50.693,59.117 v1(52.877,56.933) ; v1(59.558,77.228) 60.904,75.881 v1(64.753,75.881) ; v1(65.904,56.933) v1(52.877,56.933) ; v1@69.032,75.983 69.133,75.881 v1(84.196,75.881) ; v1(74.32,51.34) 76.957,48.703 v1(76.957,47.652) ; v1(76.017,17.944) v1(80.614,17.944) ; v1(89.149,75.881) v1(99.359,75.881) ; v1(91.028,56.984) v1(109.951,56.984) 110.815,56.12 121.127,56.12 121.973,56.966 v1(128.932,56.966) ; v1(100.172,49.897) 101.137,50.862 v1(109.291,50.862) ; v1(107.056,75.881) v1(120.924,75.881) ; v1(123.337,51.193) 123.718,51.574 v1(129.281,51.574) ; v1(124.683,70.624) 141.49,70.624 v1(142.531,69.582) v1(161.691,69.582) v1(180.725,69.582) 183.865,69.582 185.008,70.725 198.597,70.725 v1(199.74,69.582) v1(218.681,69.582) ; v1(136.85,49.542) 146.011,49.542 v1(147.281,50.812) v1(166.236,50.812) 169.286,47.762 v1(169.286,46.316) ; v1(147.254,106.345) v1(147.254,107.938) ; v1(176.779,27.418) v1(176.779,31.609) ; v1(180.97,24.269) 180.998,24.297 180.998,24.426 183.315,26.744 v1(183.315,26.749) ; v1(190.571,45.427) 190.543,45.455 190.543,45.555 v1(185.286,50.812) v1(204.244,50.812) ; v1(196.692,33.463) v1(215.691,33.463) ; v2(207.062,21.119) v2(213.253,21.119) ; v1(213.749,50.812) v1(223.234,50.812) ; v1(220.34,76.237) v1(239.161,76.237) ; v1(224.073,57.111) v1(237.662,57.111) v1(243.107,57.111) ; v1@232.182,50.812 v1(242.234,50.812) v1(242.234,42.125) ; v1@233.267,79.085 v1(233.267,87.337) v1(233.267,88.833) ; v1(238.958,25.615) 240.672,27.329 v1(247.694,27.329) 249.434,25.589 v1(255.595,25.589)
  Bottom Layer w0.203: J34.1@9.239,97.072 9.239,98.689 9.403,98.854 28.229,98.854 ; J39.1@28.229,97.098 28.229,98.854 ; J17.1@37.256,116.072 37.256,119.265 38.261,120.269 55.353,120.269 ; 46.991,98.854 28.229,98.854 ; J20.1@47.271,97.022 47.271,98.574 46.97,98.875 66.02,98.875 66.27,98.625 ; J22.1@56.245,116.072 56.245,119.377 55.353,120.269 ; J25.1@66.27,97.072 66.27,98.625 ; J27.1@75.28,116.097 75.28,119.213 74.225,120.269 ; v1(76.879,98.843) 66.488,98.843 66.27,98.625 ; J30.1@85.286,97.072 85.286,99.841 v1(86.106,100.66) 87.916,98.85 104.086,98.85 ; J32.1@94.254,116.122 94.254,119.003 92.988,120.269 ; J35.1@104.311,97.072 104.311,98.625 104.086,98.85 ; 112.169,120.247 113.253,119.163 J37.1@113.253,116.046 ; J40.1@123.294,97.072 123.294,98.625 123.069,98.85 v1(121.858,98.85) 104.086,98.85 ; v1(127.452,98.843) 127.865,99.256 141.61,99.256 142.241,98.625 J21.1@142.241,97.072 ; J18.1@132.251,116.122 132.251,119.239 131.221,120.269 ; J125.1@142.716,39.89 J125.1@142.716,40.1 142.716,42.126 142.057,42.785 139.613,42.785 137.77,44.629 137.77,47.371 138.924,48.526 144.995,48.526 v1(147.281,50.812) 147.281,52.392 J137.1@147.238,52.435 ; v1(147.254,106.345) 150.837,102.763 v1(150.837,99.275) 160.634,99.275 161.258,98.651 ; 150.239,120.242 151.268,119.213 J23.1@151.268,116.097 ; J26.1@161.258,97.098 161.258,98.651 ; J28.1@170.2,116.021 170.2,119.137 169.068,120.269 ; J31.1@180.3,97.098 180.3,99.868 179.928,100.24 161.691,100.24 161.258,99.807 161.258,98.651 ; J33.1@189.25,116.115 189.25,119.231 188.214,120.267 188.214,120.269 ; J38.1@208.205,116.115 208.205,119.231 207.639,119.798 207.634,119.798 207.162,120.269 ; J19.1@227.315,116.046 227.315,119.163 226.209,120.269 ; J24.1@246.23,116.115 246.23,119.231 245.193,120.269 ; J71.1@255.595,20.568 v1(255.595,25.589) ; J29.1@265.237,116.122 265.237,119.239 264.207,120.269 245.193,120.269 ; 55.353,120.269 74.225,120.269 ; 74.225,120.269 92.988,120.269 ; 92.988,120.269 131.221,120.269 ; 131.221,120.269 169.068,120.269 ; 169.068,120.269 188.214,120.269 ; 188.214,120.269 207.162,120.269 ; 207.162,120.269 226.209,120.269 ; 226.209,120.269 245.193,120.269
  Bottom Layer w0.254: J83.1@5.226,90.475 5.226,94.304 5.886,94.964 9.036,94.964 9.239,95.167 J34.1@9.239,97.072 ; J132.1@5.243,13.996 5.243,17.477 6.25,18.485 9.053,18.485 9.256,18.688 J130.1@9.256,20.593 9.278,20.615 9.278,22.224 9.697,22.643 v1(16.682,22.643) ; J96.1@7.731,71.476 7.731,75.058 v1(8.638,75.965) 11.541,75.965 11.744,76.168 J5.1@11.744,78.073 ; v1@10.79,50.151 10.237,50.703 10.237,56.305 10.898,56.966 13.718,56.966 14.251,57.498 J16.1@14.251,59.074 ; J141.1@15.233,33.452 v1@15.233,37.281 ; v1(15.235,37.197) 15.979,37.941 19.043,37.941 19.246,38.144 J55.1@19.246,40.049 ; v1(22.524,22.643) 27.757,22.643 28.229,22.171 J68.1@28.229,20.593 28.229,18.688 28.025,18.485 24.876,18.485 24.215,17.824 J94.1@24.215,13.996 ; v1@22.524,22.719 v1(22.524,28.968) ; J88.1@24.215,90.5 24.215,94.329 24.876,94.99 28.025,94.99 28.229,95.193 J39.1@28.229,97.098 ; J101.1@28.713,71.476 28.713,75.305 v1(29.373,75.965) 32.523,75.965 32.726,76.168 J8.1@32.726,78.073 ; J133.1@33.2,52.41 33.2,51.945 J133.1@33.708,51.437 ; J133.1@33.267,52.477 33.267,56.144 v1(34.056,56.933) 37.044,56.933 37.28,57.169 J42.1@37.28,59.074 ; v1(37.155,100.621) 37.155,103.466 33.176,107.444 J45.1@33.176,109.407 33.176,113.236 33.904,113.963 37.053,113.963 37.256,114.167 J17.1@37.256,116.072 ; v1(42.768,22.643) 42.768,29.882 43.683,30.796 J144.1@43.683,33.369 ; J99.1@43.175,13.903 J99.1@43.241,13.97 ; J52.1@43.257,90.424 43.257,94.253 43.918,94.913 47.067,94.913 47.271,95.117 J20.1@47.271,97.022 ; J99.1@43.354,14.083 J99.1@43.241,13.97 ; J99.1@43.552,14.154 v1@44.464,14.154 ; J144.1@43.775,33.452 43.775,37.061 v1(44.884,38.17) ; v1@44.858,38.17 47.541,38.17 47.788,38.416 J60.1@47.788,40.049 ; v1(47.255,22.643) 47.255,18.663 47.051,18.459 43.902,18.459 43.241,17.799 J99.1@43.241,13.97 ; v1(50.693,67.914) 48.194,70.412 48.194,70.901 J106.1@47.686,71.409 47.686,75.202 v1(48.45,75.965) 51.563,75.965 51.766,76.168 J11.1@51.766,78.073 ; J57.1@52.165,109.407 52.165,113.236 52.892,113.963 56.042,113.963 56.245,114.167 J22.1@56.245,116.072 ; J136.1@52.249,52.477 52.249,56.305 v1(52.877,56.933) 56.026,56.933 56.262,57.169 J48.1@56.262,59.074 ; v1(56.433,77.228) v1(59.558,77.228) ; J66.1@62.257,90.475 62.257,94.304 62.917,94.964 66.067,94.964 66.27,95.167 J25.1@66.27,97.072 ; J147.1@62.706,33.411 62.706,33.032 J147.1@63.214,32.524 ; J147.1@62.773,33.477 62.773,37.306 v1(63.636,38.17) 66.637,38.17 66.786,38.319 J65.1@66.786,40.075 ; v1@63.387,14.15 v1(63.286,14.15) 62.436,14.15 J104.1@62.19,13.903 62.19,17.732 62.917,18.459 66.067,18.459 66.27,18.663 J72.1@66.27,20.568 66.27,22.306 65.933,22.643 v1(64.663,22.643) ; v1(64.753,75.881) 66.035,75.881 66.678,75.238 J110.1@66.678,71.409 ; v1(65.904,56.933) 70.589,56.933 71.242,56.28 ; 66.744,75.305 67.321,75.881 70.471,75.881 70.758,76.168 J14.1@70.758,78.073 ; J76.1@71.267,109.5 71.267,113.328 71.927,113.989 75.077,113.989 75.28,114.192 J27.1@75.28,116.097 ; v1(74.32,51.34) 73.276,52.384 J139.1@71.242,52.384 71.242,56.28 ; J53.1@75.322,59.049 75.322,57.457 74.805,56.94 71.902,56.94 71.242,56.28 ; v1(76.017,14.134) v1(76.017,17.944) ; v1(76.957,47.652) 76.957,42.785 81.73,38.011 ; J75.24@79.889,10.908 79.889,17.219 v1(80.614,17.944) ; J79.1@81.273,90.475 81.273,94.304 81.934,94.964 85.083,94.964 85.286,95.167 J30.1@85.286,97.072 ; J115.1@81.73,33.503 81.73,38.011 ; v1(84.196,75.881) 84.855,75.881 85.693,75.043 ; J92.1@85.693,71.45 85.693,75.043 ; J113.1@85.744,40.1 85.744,38.542 85.593,38.391 82.11,38.391 81.73,38.011 ; 86.346,75.881 v1(89.149,75.881) 89.706,76.439 J2.1@89.706,78.048 ; 86.346,75.932 85.693,75.279 85.693,75.043 ; J81.1@90.241,109.525 90.241,113.354 90.901,114.014 94.051,114.014 94.254,114.217 J32.1@94.254,116.122 ; J142.1@90.308,52.477 90.308,56.263 v1(91.028,56.984) 94.136,56.984 94.321,57.169 J58.1@94.321,59.074 ; v1(99.359,75.881) 104.084,75.881 104.743,75.222 ; v1(100.172,49.897) 99.67,49.395 99.67,44.044 100.877,42.836 103.83,42.836 104.743,41.923 J117.1@104.743,40.126 104.743,38.221 104.54,38.017 101.39,38.017 100.73,37.357 J119.1@100.73,33.528 ; J84.1@100.298,90.475 100.298,94.304 100.958,94.964 104.108,94.964 104.311,95.167 J35.1@104.311,97.072 ; J97.1@104.743,71.501 104.743,75.222 ; J6.1@108.756,78.099 108.756,76.413 108.224,75.881 105.294,75.881 104.743,75.33 104.743,75.222 ; J86.1@109.24,109.449 109.24,113.278 109.9,113.938 113.05,113.938 113.253,114.141 J37.1@113.253,116.046 ; v1(109.291,50.862) 109.289,50.864 109.289,56.331 109.95,56.991 113.099,56.991 113.303,57.194 J63.1@113.303,59.099 ; J89.1@119.281,90.475 119.281,94.304 119.941,94.964 123.091,94.964 123.294,95.167 J40.1@123.294,97.072 ; J123.1@119.711,33.503 119.711,37.332 120.372,37.992 123.521,37.992 123.725,38.195 J121.1@123.725,40.1 123.725,41.661 123.312,42.074 120.34,42.074 118.897,43.516 118.897,47.16 122.906,51.169 123.313,51.169 v1(123.337,51.193) ; v1(120.924,75.881) 123.049,75.881 123.693,75.238 ; J102.1@123.693,71.919 123.693,75.238 ; J9.1@127.773,78.073 127.773,76.389 127.265,75.881 124.336,75.881 123.693,75.238 ; J134.1@128.204,52.41 J134.1@128.204,52.082 ; J46.1@128.238,109.525 128.238,113.354 128.898,114.014 132.048,114.014 132.251,114.217 J18.1@132.251,116.122 ; J134.1@128.271,52.477 128.271,56.305 v1(128.932,56.966) 132.081,56.966 132.284,57.169 J43.1@132.284,59.074 ; v1(129.281,51.574) 128.712,51.574 J134.1@128.204,52.082 ; v1(136.85,49.542) 135.758,50.634 128.519,50.634 128.204,50.948 J134.1@128.204,52.082 ; J56.1@138.228,90.475 138.228,94.304 138.888,94.964 142.038,94.964 142.241,95.167 J21.1@142.241,97.072 ; J128.1@138.636,33.436 138.636,37.265 139.363,37.992 142.513,37.992 142.716,38.195 J125.1@142.716,39.89 ; v1(142.531,69.582) J107.1@142.531,71.325 ; J107.1@142.539,71.333 142.539,75.162 143.267,75.889 146.416,75.889 146.619,76.092 J12.1@146.619,77.997 ; v1(147.254,107.938) 147.254,113.328 147.915,113.989 151.064,113.989 151.268,114.192 J23.1@151.268,116.097 ; J137.1@147.305,52.502 147.305,56.331 147.966,56.991 151.115,56.991 151.318,57.194 J49.1@151.318,59.099 ; J67.1@157.245,90.5 157.245,94.329 157.905,94.99 161.055,94.99 161.258,95.193 J26.1@161.258,97.098 ; J131.1@157.735,33.503 157.735,37.332 158.396,37.992 161.545,37.992 161.748,38.195 161.748,42.639 162.936,43.827 168.092,43.827 169.286,45.02 v1(169.286,46.316) ; v1@161.691,69.608 J111.1@161.691,71.169 ; J111.1@161.766,71.476 161.766,75.305 162.426,75.965 165.576,75.965 165.779,76.168 J15.1@165.779,78.073 ; J77.1@166.187,109.423 166.187,113.252 166.847,113.913 169.997,113.913 170.2,114.116 J28.1@170.2,116.021 ; J54.1@170.316,59.099 170.316,57.194 170.113,56.991 166.963,56.991 166.236,56.264 J140.1@166.236,52.435 v1(166.236,50.812) v1(185.286,50.812) 185.286,52.384 J143.1@185.235,52.435 ; J80.1@176.22,90.434 176.245,90.408 176.245,88.505 177.414,87.337 195.879,87.337 ; J80.1@176.287,90.5 176.287,94.329 176.947,94.99 180.097,94.99 180.3,95.193 J31.1@180.3,97.098 ; v1(176.779,27.418) 177.45,26.746 183.313,26.746 v1(183.315,26.749) ; v1(176.779,31.609) 176.777,31.611 176.777,36.637 178.158,38.017 180.587,38.017 180.79,38.221 J114.1@180.79,40.126 180.79,42.981 181.154,43.344 188.564,43.344 190.571,45.351 192.044,43.877 198.826,43.877 199.697,43.006 J118.1@199.697,40.1 199.697,38.195 199.494,37.992 196.345,37.992 195.684,37.332 J120.1@195.684,33.503 ; v1@180.724,69.608 J93.1@180.724,71.531 ; J93.1@180.766,71.476 180.766,75.305 181.427,75.965 184.576,75.965 184.78,76.168 J3.1@184.78,78.073 ; v1(180.97,24.269) 182.29,22.948 188.503,22.948 189.258,22.193 J74.1@189.258,20.593 189.258,18.689 187.058,16.488 J109.1@187.058,13.929 ; J82.1@185.237,109.525 185.237,113.354 185.897,114.014 189.047,114.014 189.25,114.217 J33.1@189.25,116.122 ; J143.1@185.302,52.502 185.302,56.331 185.963,56.991 189.112,56.991 189.315,57.194 J59.1@189.315,59.099 ; J85.1@195.202,90.434 195.202,88.015 195.879,87.337 ; J85.1@195.268,90.5 195.268,94.329 195.929,94.99 199.078,94.99 199.282,95.193 J36.1@199.282,97.098 ; J120.1@195.617,33.436 v1@196.625,33.436 ; v1(199.74,69.582) J98.1@199.74,71.589 ; J98.1@199.766,71.45 199.766,75.279 200.426,75.94 203.576,75.94 203.779,76.143 J7.1@203.779,78.048 ; J95.1@203.693,13.929 203.693,17.503 204.896,18.706 207.918,18.706 208.259,19.047 208.259,20.52 J69.1@208.307,20.568 208.307,22.103 207.963,22.447 207.515,22.447 207.062,21.993 v2(207.062,21.119) ; J87.1@204.192,109.525 204.192,113.354 204.852,114.014 208.002,114.014 208.205,114.217 J38.1@208.205,116.122 ; J146.1@204.227,52.41 204.227,56.239 204.954,56.966 208.103,56.966 208.307,57.169 J64.1@208.307,59.074 ; v1@204.243,50.714 J146.1@204.243,52.41 ; v1@204.244,50.71 204.284,50.71 204.385,50.812 v1(213.749,50.812) ; v2(213.253,21.119) 234.462,21.119 v1@238.94,25.597 ; J124.1@214.717,33.477 214.717,37.306 215.377,37.967 218.527,37.967 218.73,38.17 J122.1@218.73,40.075 ; J124.1@214.817,33.463 v1(215.691,33.463) ; J41.1@218.306,97.072 218.306,95.167 218.103,94.964 214.953,94.964 214.293,94.304 214.293,87.872 214.828,87.337 ; v1@218.681,69.586 J103.1@218.681,71.409 218.681,74.578 v1(220.34,76.237) 222.549,76.237 222.753,76.44 ; 222.761,76.44 J10.1@222.761,78.073 ; v1(223.234,50.812) 223.234,56.271 v1(224.073,57.111) 227.071,57.111 227.314,57.354 J44.1@227.314,59.099 ; v1@223.249,50.812 v1(232.198,50.812) ; J51.1@223.302,109.449 223.302,113.278 223.962,113.938 227.112,113.938 227.315,114.141 J19.1@227.315,116.046 ; v1(233.267,87.337) 214.828,87.337 ; v1(233.267,88.833) 233.267,94.304 233.927,94.964 237.077,94.964 237.28,95.167 J1.1@237.28,97.072 ; v1(233.268,76.237) v1(233.268,79.158) ; J105.1@234.843,13.982 234.843,17.732 235.57,18.459 238.432,18.459 238.923,18.951 J73.1@238.923,20.568 238.94,20.585 v1@238.94,25.597 ; v1(237.662,57.111) J108.1@237.662,71.409 ; J108.1@237.729,71.476 237.729,74.805 v1(239.161,76.237) 241.396,76.237 241.742,76.583 J13.1@241.742,78.073 ; v1(238.958,25.615) v1@238.94,25.597 ; J62.1@242.217,109.55 242.217,113.379 242.877,114.04 246.027,114.04 246.23,114.243 J24.1@246.23,116.148 ; v1(242.234,42.125) 251.302,42.125 251.774,41.653 251.774,38.17 251.571,37.967 248.421,37.967 247.694,37.239 J127.1@247.694,33.411 v1(247.694,27.329) ; v1(242.234,50.812) J138.1@242.234,52.41 ; v1(243.107,57.111) 245.917,57.111 246.314,57.508 J50.1@246.314,59.074 ; J100.1@251.505,13.991 251.505,17.742 252.233,18.469 255.382,18.469 255.585,18.672 J71.1@255.585,20.577 ; J78.1@261.224,109.525 261.224,113.354 261.885,114.014 265.034,114.014 265.237,114.217 J29.1@265.237,116.122 ; 195.879,87.337 214.828,87.337
  other v1: 69.159,75.881 140.858,99.256
pads on no net: J47.66 J47.67 J47.68 J47.69 J47.70 J47.71 J47.72 J47.73 J47.74 J47.75 J47.76 J47.77 J47.78 J47.79 J47.80 J75.22 J75.23